# Altium PCB board.PcbDoc
Units mm, origin at the board's own origin, x right, y up, seen from the top; angles counter-clockwise.
Board outline 114.5 x 62 mm, 2 copper layers (Top Layer, Bottom Layer), stack 0.97 mm thick; 31 components, 31 nets, 110 pads, 0 vias.
Unrouted connection lines stored in the file: 2.
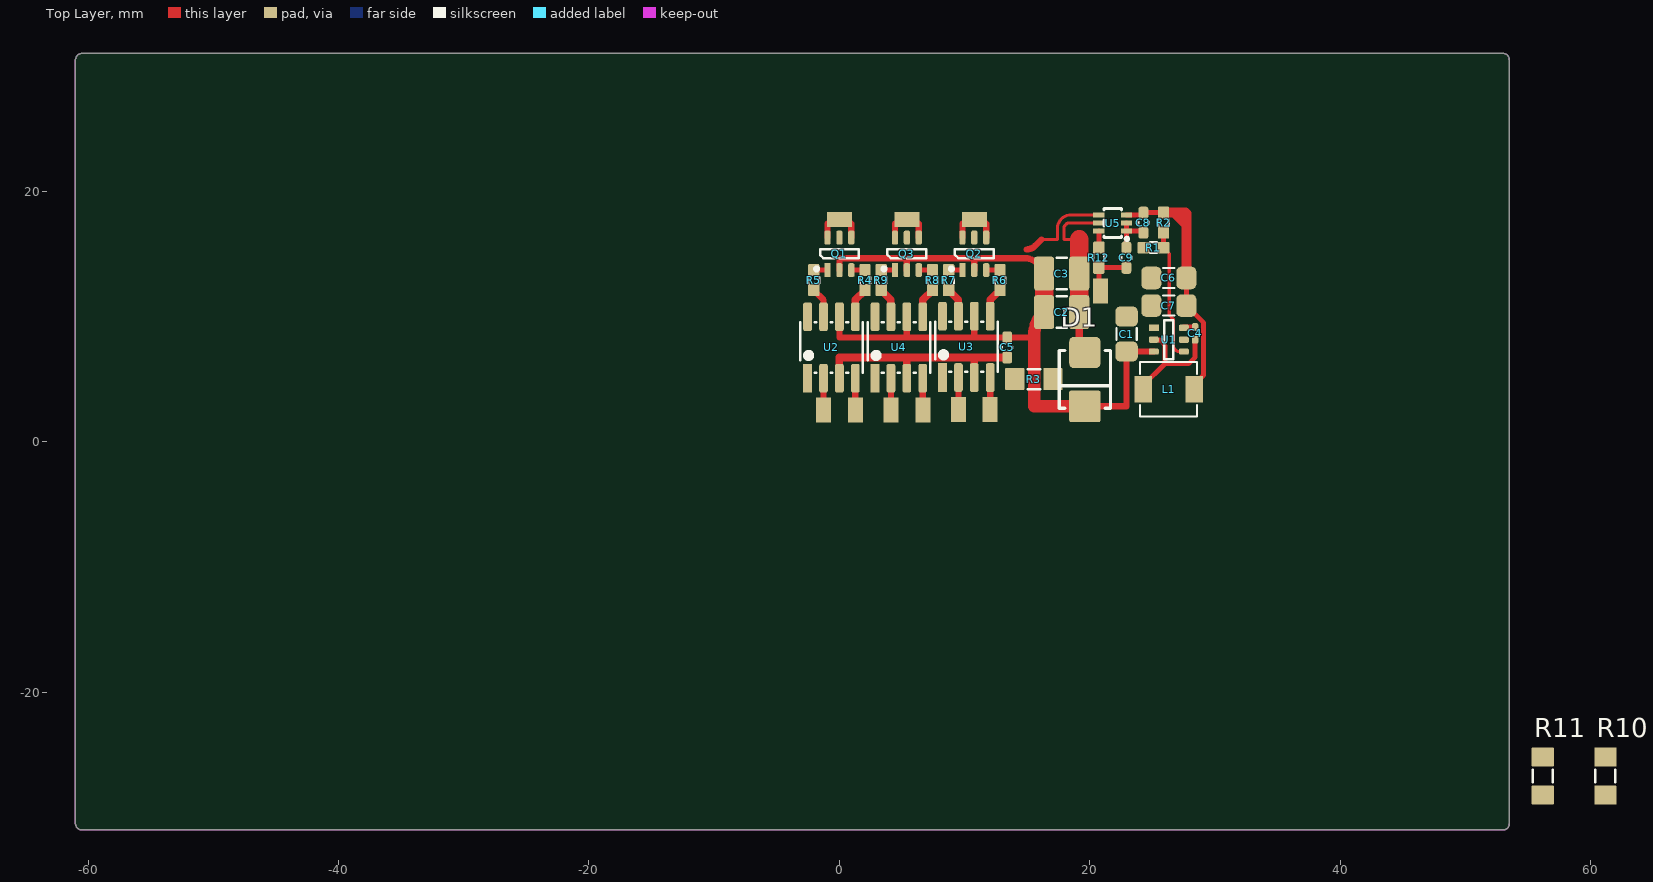
[diagram p0: Top Layer view]
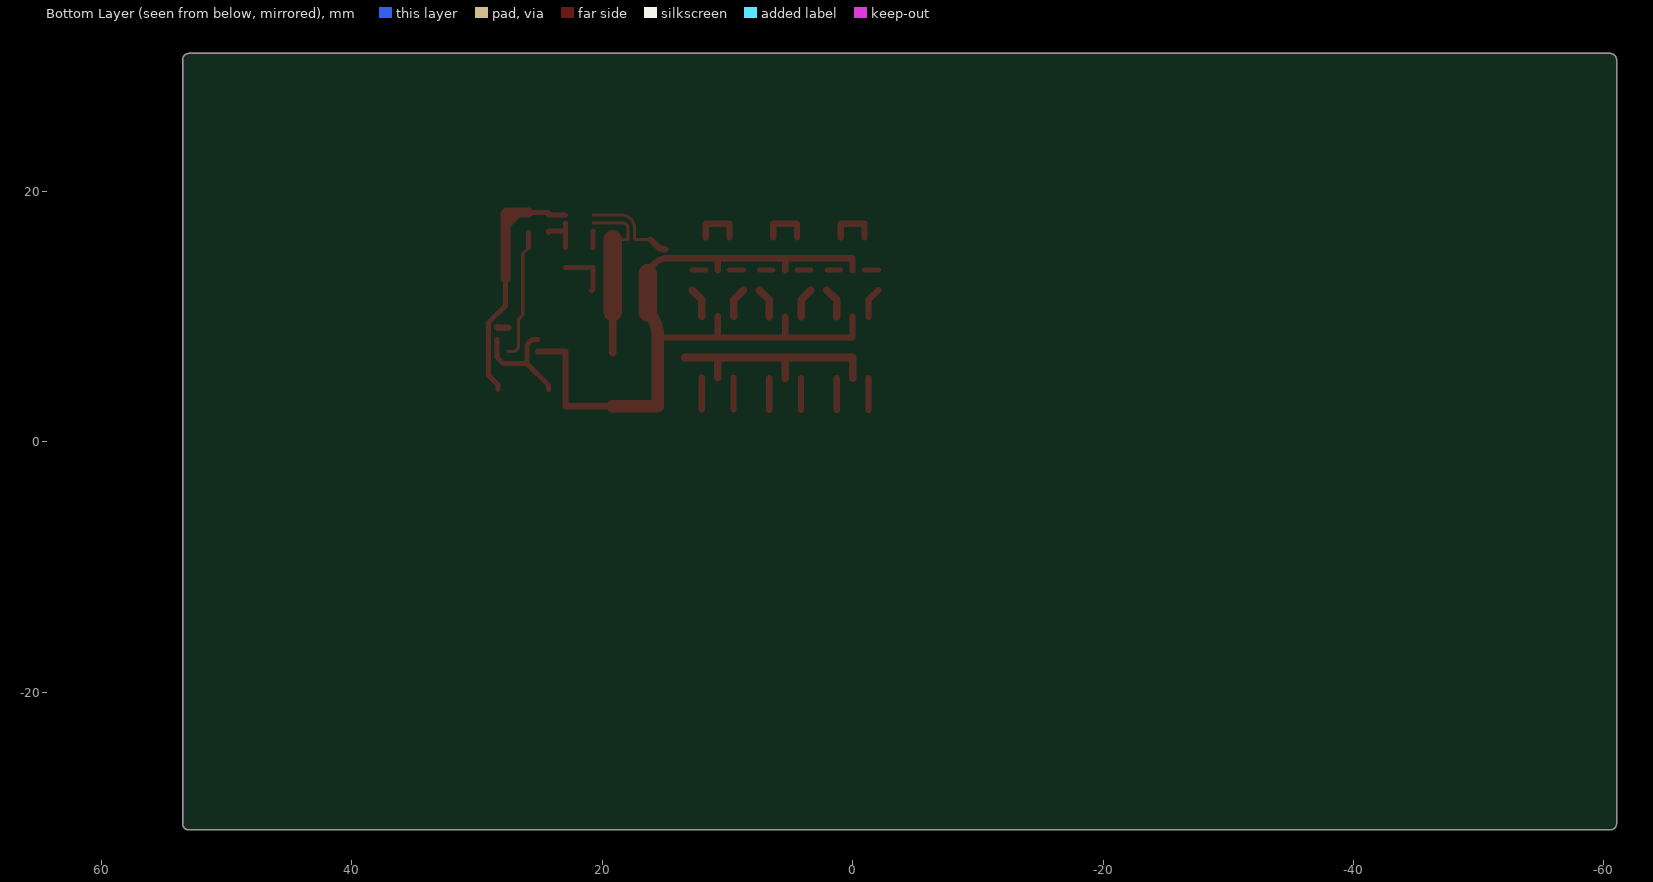
[diagram p1: Bottom Layer view, seen from below]
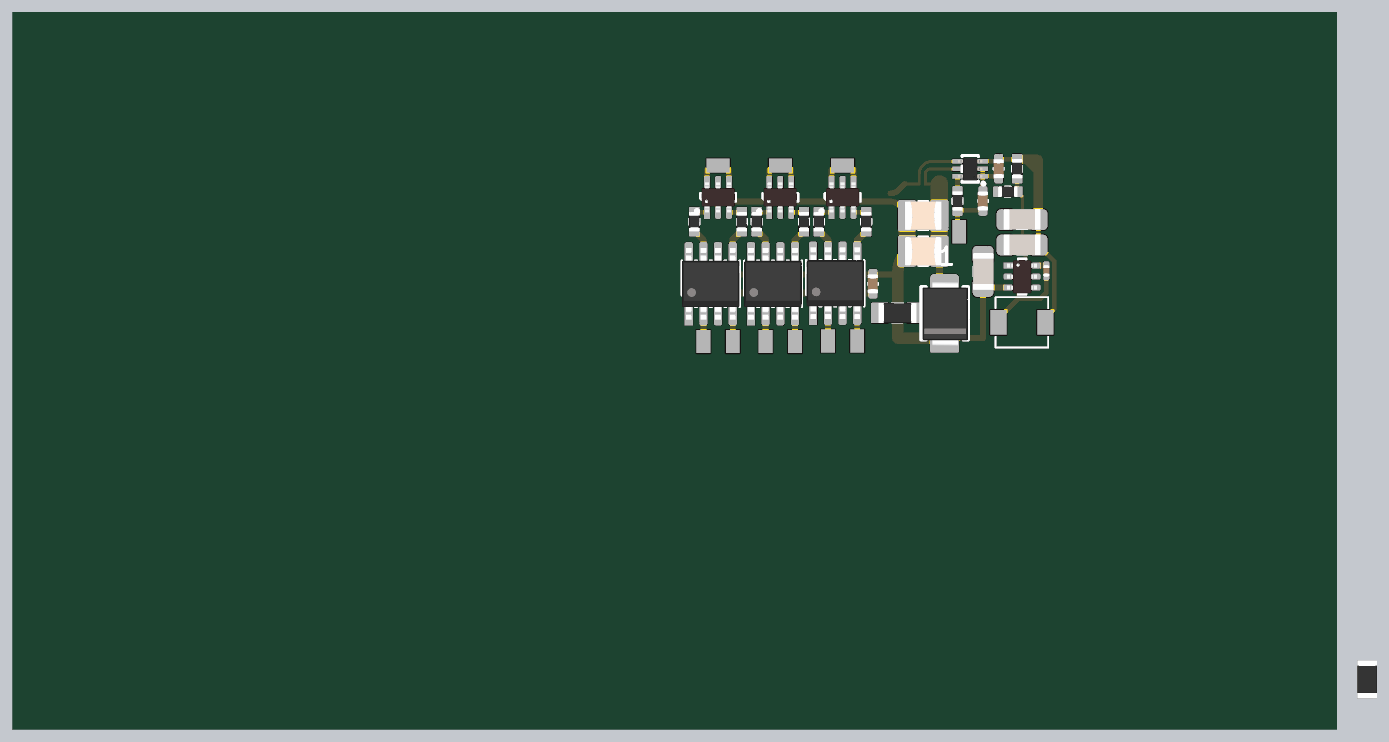
[diagram p2: 3D render of the assembled board from above, using the file's embedded part models]

## Layer stack, top to bottom
Top Solder: solder mask 0.0127, Solder Resist, Dk 3.8
Top Layer: signal copper 0.035
Dielectric: core 0.9, FR-4, Dk 4.5
Bottom Layer: signal copper 0.035
Bottom Solder: solder mask 0.0127, Solder Resist, Dk 3.8

## Board outline
-61,-30.5 ccw(c-60.5,-30.5) -60.5,-31 53,-31 ccw(c53,-30.5) 53.5,-30.5 53.5,30.5 ccw(c53,30.5) 53,31 -60.5,31 ccw(c-60.5,30.5) -61,30.5

## Design rules (kind name [scope] priority, off if disabled: settings)
AcuteAngle [All] p1: minimum=6.00000000000000E+0001 checktracksonly=FALSE
BoardOutlineClearance [All] p1: gap=0.3 ignorepadtopadclearanceinfootprint=FALSE
Clearance Clearance_1 [All] p1: gap=0.25 ignorepadtopadclearanceinfootprint=FALSE except(0.13: Arc-Arc Arc-Track Arc-SMDPad Arc-Via Track-Track Track-SMDPad Track-Via SMDPad-SMDPad SMDPad-Via THPad-Via Via-Via; 0.15: Arc-THPad Arc-Text Arc-Hole Track-THPad Track-Text Track-Hole SMDPad-THPad SMDPad-Text SMDPad-Hole THPad-THPad THPad-Text THPad-Hole Via-Text Via-Hole Fill-Text Fill-Hole Poly-Text Poly-Hole Region-Text Region-Hole Text-Text Text-Hole)
ComponentClearance ComponentClearance_1 [IsFree] p1: gap=-1 collisioncheckmode=3 verticalgap=2540 showdistances=FALSE
ComponentClearance [All] p2: gap=0.3 collisioncheckmode=3 verticalgap=0.254 showdistances=FALSE
Height [All] p1: minheight=0 maxheight=500 prefheight=12.7
HoleSize [All] p1: absolutevalues=TRUE maxlimit=6 minlimit=0.2 maxpercent=80.000 minpercent=20.000
HoleToHoleClearance HoleToHoleClearance_1 [IsVia vs IsThruPin] p1: gap=0.7 allowstackedmicrovias=TRUE
HoleToHoleClearance [All] p2: gap=0.5 allowstackedmicrovias=TRUE
MinimumSolderMaskSliver [All] p1 off: minsoldermaskwidth=0.254
PlaneClearance [All] p1: clearance=0.45
PlaneConnect [All] p1: planeconnectstyle=Direct reliefexpansion=0.3 reliefentries=4 reliefconductorwidth=0.381 reliefairgap=0.178
PolygonConnect [All] p1: connectstyle=Direct reliefconductorwidth=0.381 reliefentries=4 polygonreliefangle="90 Angle" airgapwidth=0.356
RoutingVias [All] p1: holewidth=0.3 width=0.6 viastyle="Through Hole" minholewidth=0.2 minwidth=0.45 maxholewidth=0.9 maxwidth=1.27
SilkToSilkClearance [All] p1 off: silktosilkclearance=0.254
SilkToSolderMaskClearance [IsPad] p1 off: minsilkscreentomaskgap=0.254 clearancetoexposedcopper=TRUE
SolderMaskExpansion [All] p1: expansion=0.102 istentingtop=FALSE
SupplyNets "Schematic Supply Nets_7" [InNet('Vr')] p1: voltage=0.000
SupplyNets "Schematic Supply Nets_2" [InNet('3V3')] p2: voltage=0.000
SupplyNets "Schematic Supply Nets_1" [InNet('GND')] p3: voltage=0.000
UnRoutedNet [All] p1: checkbadconnections=TRUE
Width [All] p1: maxlimit=3.81 minlimit=0.14 preferedwidth=0.254
20 further rules are at their usual default settings.

## Classes and differential pairs
component class board: C1 C2 C3 C4 C5 C6 C9 D1 L1 Q1 Q2 Q3 R2 R4 R5 R6 R7 R8 R9 R12 U1 U4 U5

## Components (designator, comment, footprint, x,y, rotation, side; value= is the part's Value field where it differs from the comment)
C1 "10uF" C1206 22.927,8.596 r270 top
C2 "4n7" C1210-2.5MM 17.75,10.348 r0 top
C3 "4n7" C1210-2.5MM 17.75,13.425 r0 top
C4 "100nF" C0402 28.402,8.646 r270 top
C5 "4n7" C0603 13.398,7.524 r270 top
C6 "10uF" C1206 26.302,13.074 r0 top
C7 "10uF" C1206 26.302,10.874 r0 top
C8 "1uF" C0603 24.278,17.489 r90 top
C9 "1uF" C0603 22.914,14.692 r270 top
D1 "15V?" SMB 19.6,4.972 r270 top
L1 "4.7uH" IND-SMD_L4.4-W4.2 26.289,4.18 r180 top
Q1 "AP8G02LI" SOT-23-6#1 0,15 r0 top
Q2 "AP8G02LI" SOT-23-6#1 10.77,15 r0 top
Q3 "AP8G02LI" SOT-23-6#1 5.385,15 r0 top
R1 "100" R0603 25.078,15.492 r0 top
R2 "100" R0603 25.878,17.489 r90 top
R3 "0" R1206 15.524,5 r180 top
R4 "100" R0603 2.05,12.9 r90 top
R5 "100" R0603 -2.05,12.9 r90 top
R6 "100" R0603 12.82,12.9 r90 top
R7 "100" R0603 8.72,12.9 r90 top
R8 "100" R0603 7.435,12.9 r90 top
R9 "100" R0603 3.335,12.9 r90 top
R10 "0.010" R1206 61.162,-26.699 r90 top
R11 "0.010" R1206 56.162,-26.699 r90 top
R12 "100" R0603 20.714,14.692 r270 top
U1 "TPS54202DDCR" SOT-23-6#2 26.302,8.146 r180 top
U2 "IX4427NTR" SO-8 -0.635,7.524 r0 top
U3 "IX4427NTR" SO-8 10.135,7.574 r0 top
U4 "IX4427NTR" SO-8 4.75,7.524 r0 top
U5 "INA199A1" SC-70-6 21.814,17.464 r0 top

## Footprints (in the part's own frame and the unit in brackets; to place one, negate y for a bottom-side part, rotate by r counter-clockwise, add the part's x,y. Pads: shape width x height; smd on the part's side, far side on the other; paste and mask are expansions set on the pad)
C0402 [mm] "Chip Capacitor Body"
  rrect50% 0.635x0.508 smd mask+0.05: 1(-0.5,0) 2(0.5,0)
  body extent -0.52,-0.27 0.53,0.28, height 0.55
C0603 [mil] "Chip Capacitor"
  rrect50% 38x31 smd mask+1.97: 1(-31.5,0) 2(31.5,0)
  silkscreen extent -3,-17 3,17, body extent -33,-18 33,18, height 35
C1206 [mm] "Chip Capacitor"
  rrect50% 1.6x1.8 smd: 1(-1.4,0) 2(1.4,0)
  silkscreen extent -0.45,-0.8 0.45,0.8, body extent -1.6,-0.88 1.6,0.92, height 1.6
C1210-2.5MM [mm] "Chip Capacitor"
  rrect25% 1.6x2.7 smd mask+0.05: 1(-1.4,0) 2(1.4,0)
  silkscreen extent -0.4,-1.25 0.4,1.25, body extent -1.6,-1.25 1.6,1.25, height 2.52
IND-SMD_L4.4-W4.2 [mm]
  rect 1.4x2.12 smd: 1(2.028,0) 2(-2.028,0)
  silkscreen extent -2.28,-2.18 2.28,2.18, body extent -2.28,-2.18 2.28,2.18, height 1.8
R0603 [mil] "Chip Resistor; Body 1.6 x 0.8 mm (LxW typ)"
  rrect20% 38x35.43 smd mask+1.97: 1(-31.5,0) 2(31.5,0)
  silkscreen extent -10,-17 10,17, body extent -33,-18 33,18, height 22
R1206 [mil] "Chip Resistor"
  rrect10% 60x70 smd mask+1.97: 1(-60,0) 2(60,0)
  silkscreen extent -20,-31 20,31, body extent -65,-33 65,33, height 26
SC-70-6 [mm]
  rect 0.9x0.4 smd paste+0 mask+0.051: 1(1.1,-0.65) 2(1.1,0) 3(1.1,0.65) 4(-1.1,0.65) 5(-1.1,0) 6(-1.1,-0.65)
  silkscreen extent -0.7,-1.4 1.27,1.15, body extent -1.05,-1 1.05,1, height 0.95
SMB [mm]
  rrect30% 2.5x2.5 smd mask+0.05: 1(-2.15,0)
  rrect10% 2.5x2.5 smd mask+0.05: 2(2.15,0)
  silkscreen extent -2.3,-2.05 2.3,2.05, body extent -2.75,-1.93 2.85,2.02, height 2.65
SO-8 [mm] "SOIC, 8-Leads, Body 4.9x3.9mm, Pitch 1.27mm, IPC Low Density"
  rect 0.7x2.3 smd mask+0.05: 1(-1.905,-2.45)
  rrect50% 0.7x2.3 smd mask+0.05: 2(-0.635,-2.45) 3(0.635,-2.45) 4(1.905,-2.45) 5(1.905,2.45) 6(0.635,2.45) 7(-0.635,2.45) 8(-1.905,2.45)
  silkscreen extent -2.5,-2 2.5,2, body extent -2.5,-3.1 2.5,3.1, height 1.75
SOT-23-6#1 [mm]
  rect 0.5x1.1 smd mask+0.05: 1(-0.95,-1.3)
  rrect50% 0.5x1.1 smd mask+0.05: 2(0,-1.3) 3(0.95,-1.3) 4(0.95,1.3) 5(0,1.3) 6(-0.95,1.3)
  silkscreen extent -1.95,-1.32 1.55,0.35, body extent -1.45,-1.3 1.45,1.3, height 1.14
SOT-23-6#2 [mm]
  rect 0.8x0.5 smd mask+0.05: 1(1.2,-0.95)
  rrect50% 0.8x0.5 smd mask+0.05: 2(1.2,0) 3(1.2,0.95) 4(-1.2,0.95) 5(-1.2,0) 6(-1.2,-0.95)
  silkscreen extent -0.35,-1.55 0.35,1.55, body extent -1.3,-1.45 1.3,1.45, height 1.14

## Part data
C1 C6 C7: library part CAP, LCSC part number=C89632, P/N=CL31B106KBHNNNE
C2 C3 C5: library part CAP, "4n7 0402"
C4: library part CAP
C8 C9: library part CAP, "1uF 0603"
D1: library part SMCJ54A
L1: LCSC part number=C167208, P/N=FXL0420-4R7-M
Q1 Q2 Q3: "MOSFET N-CH & P-CH", LCSC part number=C2589, P/N=IRLML2502TRPBF
R1 R2 R4 R5 R6 R7 R8 R9 R10 R11 R12: library part RES, LCSC part number=C138044, P/N=RC0402FR-0718KL
R3: library part RES
U1: library part AP63203WU-7

## Free pads (board coordinates)
  rect 1.2x2 smd: 6(-1.27,2.524) 6(1.27,2.524) 6(4.115,2.524) 6(6.655,2.524) 6(9.5,2.574) 6(12.04,2.574) 6(20.865,12.028)
  rect 2x1.2 smd: 6(0,17.75) 6(5.385,17.75) 6(10.77,17.75)

## Nets (pads, with @x,y where several pads share a name; then routed paths per layer and width w, separated by ;. In a path a pad name is that pad's centre, name@x,y a point inside that pad or via, vN(x,y) a via of type N, cw(c..) or ccw(c..) an arc to the next point about the centre after c; other vN are vias at no path point)
3V3: C6.2 C7.2 C8.2 L1.2 R2.2 U5.3 | length 21.2
  Top Layer w0.4: U5.3 24.278,18.114 C8.2 R2.2 ; C6.2 C7.2 29.083,9.493 29.083,5.326 28.317,4.56 L1.2
  Top Layer w0.8: R2.2 26.759,18.289 ; 27.64,18.289 26.759,18.289 ; C6.2 27.702,17.346 ; 27.702,18.228 27.702,17.346 ; 26.759,18.289 27.702,17.346
GND: C1.1 C2.2 C3.2 C5.2 C6.1 C7.1 C8.1 C9.1 D1.1 Q1.5 R1.1 R3.1 R3.2 R10.1 R11.1 U1.1 U2.3 U3.3 U4.3 U5.2 | length 37.2
  Top Layer w0.25: 19.188,16.152 17.932,16.152 17.932,17.039 cw(c18.357,17.039) 18.357,17.464 20.714,17.464
  Top Layer w0.3: C3.2@19.15,12.739 C3.2
  Top Layer w0.4: 19.15,16.152 19.188,16.152 ; C9.1 22.914,16.814 ; U5.2 22.914,16.814 ; C8.1 24.278,16.814 22.914,16.814
  Top Layer w0.6: U2.3 0,6.724 5.385,6.724 ; U4.3 5.385,6.724 ; U3.3 10.77,6.724 ; C5.2 10.77,6.724 ; D1.1@19.15,7.122 C2.2 ; C3.2@19.15,12.728 C3.2@19.5,12.378 ; 5.385,6.724 10.77,6.724
  Top Layer w1.5: C2.2 19.15,12.378 C3.2 19.15,16.152
NetC4_1: C4.1 U1.6 | length 0.9
  Top Layer w0.5: U1.6 28.352,9.096 ccw(c28.352,9.146) C4.1
NetC4_2: C4.2 L1.1 U1.2 | length 9.3
  Top Layer w0.4: L1.1 24.261,4.504 25.994,6.237 ; U1.2 25.381,8.146 cw(c25.381,7.533) 25.994,7.533 25.994,6.237 ; C4.2 28.402,6.75 27.889,6.237 25.994,6.237
NetC9_2: C9.2 pad.6@20.865,12.028 R12.2 | length 4.1
  Top Layer w0.4: pad.6@20.865,12.028 20.714,12.18 R12.2 C9.2
NetQ1_1: Q1.1 R5.2 | length 1.1
  Top Layer w0.4: R5.2 Q1.1
NetQ1_3: Q1.3 R4.2 | length 1.1
  Top Layer w0.4: Q1.3 R4.2
NetQ2_1: Q2.1 R7.2 | length 1.1
  Top Layer w0.4: R7.2 Q2.1
NetQ2_3: Q2.3 R6.2 | length 1.1
  Top Layer w0.4: Q2.3 R6.2
NetQ2_5: Q2.5 R10.2
NetQ3_1: Q3.1 R9.2 | length 1.1
  Top Layer w0.4: R9.2 Q3.1
NetQ3_3: Q3.3 R8.2 | length 1.1
  Top Layer w0.4: Q3.3 R8.2
NetQ3_5: Q3.5 R11.2
NetR1_2: R1.2 R2.1 U1.4 | length 10.4
  Top Layer w0.25: R1.2 26.34,15.03 26.34,10.121 26.67,9.79 26.67,7.685 ccw(c27.159,7.685) 27.159,7.196 U1.4
  Top Layer w0.4: R1.2 R2.1
NetR4_1: R4.1 U2.5 | length 2.4
  Top Layer w0.6: U2.5 1.27,11.32 R4.1
NetR5_1: R5.1 U2.7 | length 2.4
  Top Layer w0.5: R5.1 -1.27,11.32 U2.7
NetR6_1: R6.1 U3.5 | length 2.4
  Top Layer w0.6: U3.5 12.04,11.32 R6.1
NetR7_1: R7.1 U3.7 | length 2.4
  Top Layer w0.6: R7.1 9.5,11.32 U3.7
NetR8_1: R8.1 U4.5 | length 2.4
  Top Layer w0.6: U4.5 6.655,11.32 R8.1
NetR9_1: R9.1 U4.7 | length 2.4
  Top Layer w0.6: R9.1 4.115,11.32 U4.7
NetR12_1: R12.1 U5.6 | length 1.3
  Top Layer w0.4: R12.1 U5.6
PH_U: pad.6@0,17.75 Q1.4 Q1.6 | length 4.1
  Top Layer w0.5: Q1.6 -0.95,17.396 0.95,17.396 Q1.4
PH_V: pad.6@10.77,17.75 Q2.4 Q2.6 | length 4.1
  Top Layer w0.5: Q2.6 9.82,17.396 11.72,17.396 Q2.4
PH_W: pad.6@5.385,17.75 Q3.4 Q3.6 | length 4.1
  Top Layer w0.5: Q3.6 4.435,17.396 6.335,17.396 Q3.4
U_H: pad.6@1.27,2.524 U2.4 | length 2.5
  Top Layer w0.5: pad.6@1.27,2.524 U2.4
U_L: pad.6@-1.27,2.524 U2.2 | length 2.5
  Top Layer w0.5: pad.6@-1.27,2.524 U2.2
V_H: pad.6@12.04,2.574 U3.4 | length 2.5
  Top Layer w0.5: pad.6@12.04,2.574 U3.4
V_L: pad.6@9.5,2.574 U3.2 | length 2.5
  Top Layer w0.5: pad.6@9.5,2.574 U3.2
Vr: C1.2 C2.1 C3.1 C5.1 D1.2 Q1.2 Q2.2 Q3.2 U1.3 U2.6 U3.6 U4.6 | length 64.6
  Top Layer w0.5: U2.6 0,8.324 5.385,8.324 ; Q1.2 0,14.65 5.385,14.65 ; U4.6 5.385,8.324 ; Q3.2 5.385,14.65 ; U3.6 10.77,8.324 ; Q2.2 10.77,14.65 ; 15.556,8.324 C5.1 10.77,8.324 ; C3.1 16.35,13.66 15.736,14.275 ccw(c14.829,13.368) 14.829,14.65 10.77,14.65 ; D1.2 22.927,2.822 C1.2 U1.3 ; 5.385,8.324 10.77,8.324 ; 5.385,14.65 10.77,14.65
  Top Layer w1: C2.1 16.3,10.297 ccw(c18.096,8.501) 15.556,8.501 15.556,8.324 15.556,2.822 D1.2@19.15,2.822
  Top Layer w1.5: C2.1 C3.1
W_H: pad.6@6.655,2.524 U4.4 | length 2.5
  Top Layer w0.5: pad.6@6.655,2.524 U4.4
W_L: pad.6@4.115,2.524 U4.2 | length 2.5
  Top Layer w0.5: pad.6@4.115,2.524 U4.2
pads on no net: U1.5 U2.1 U2.8 U3.1 U3.8 U4.1 U4.8 U5.1 U5.4 U5.5
copper on no net: | length 7.6
  Top Layer w0.25: 16.14,16.152 17.406,16.152 17.406,17.023 cw(c18.496,17.023) 18.496,18.114 20.714,18.114
  Top Layer w0.5: 14.93,15.35 ccw(c14.93,16.334) 15.626,15.638 16.14,16.152

## Keep-outs
Keep-Out Layer:
  the board outline again, w0

## Silkscreen, mask and mechanical layers (free items; w line width, h text height)
Board Shape:
  the board outline again, w0